# EAGLE board 1794743564906_Budík-Venkovni teplota (EAGLE 9.6.2)
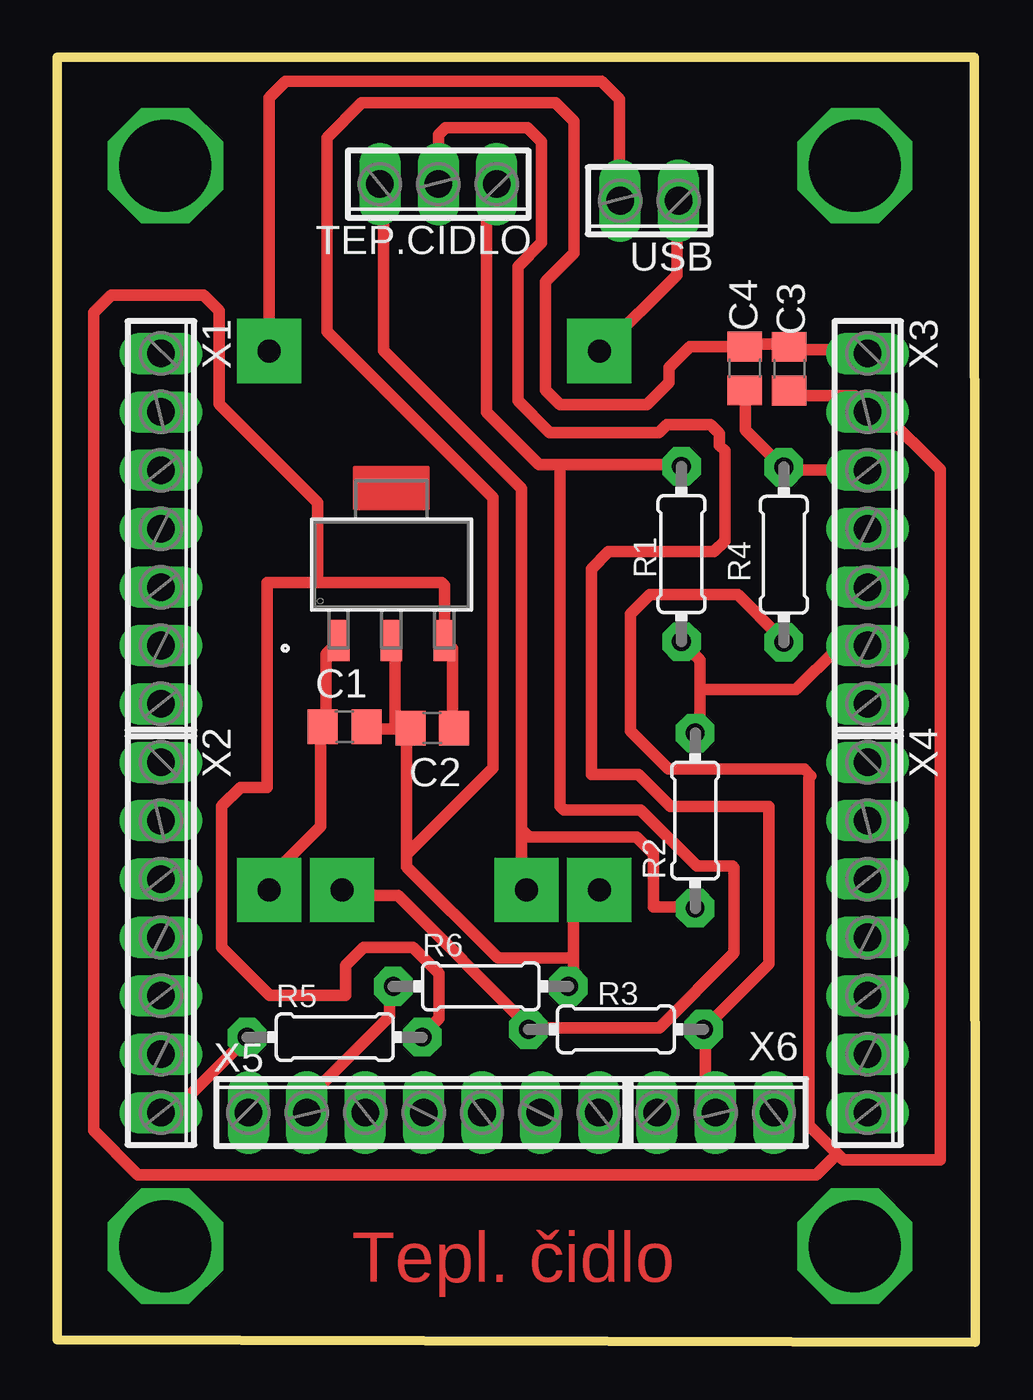
[diagram p0: board, top side]
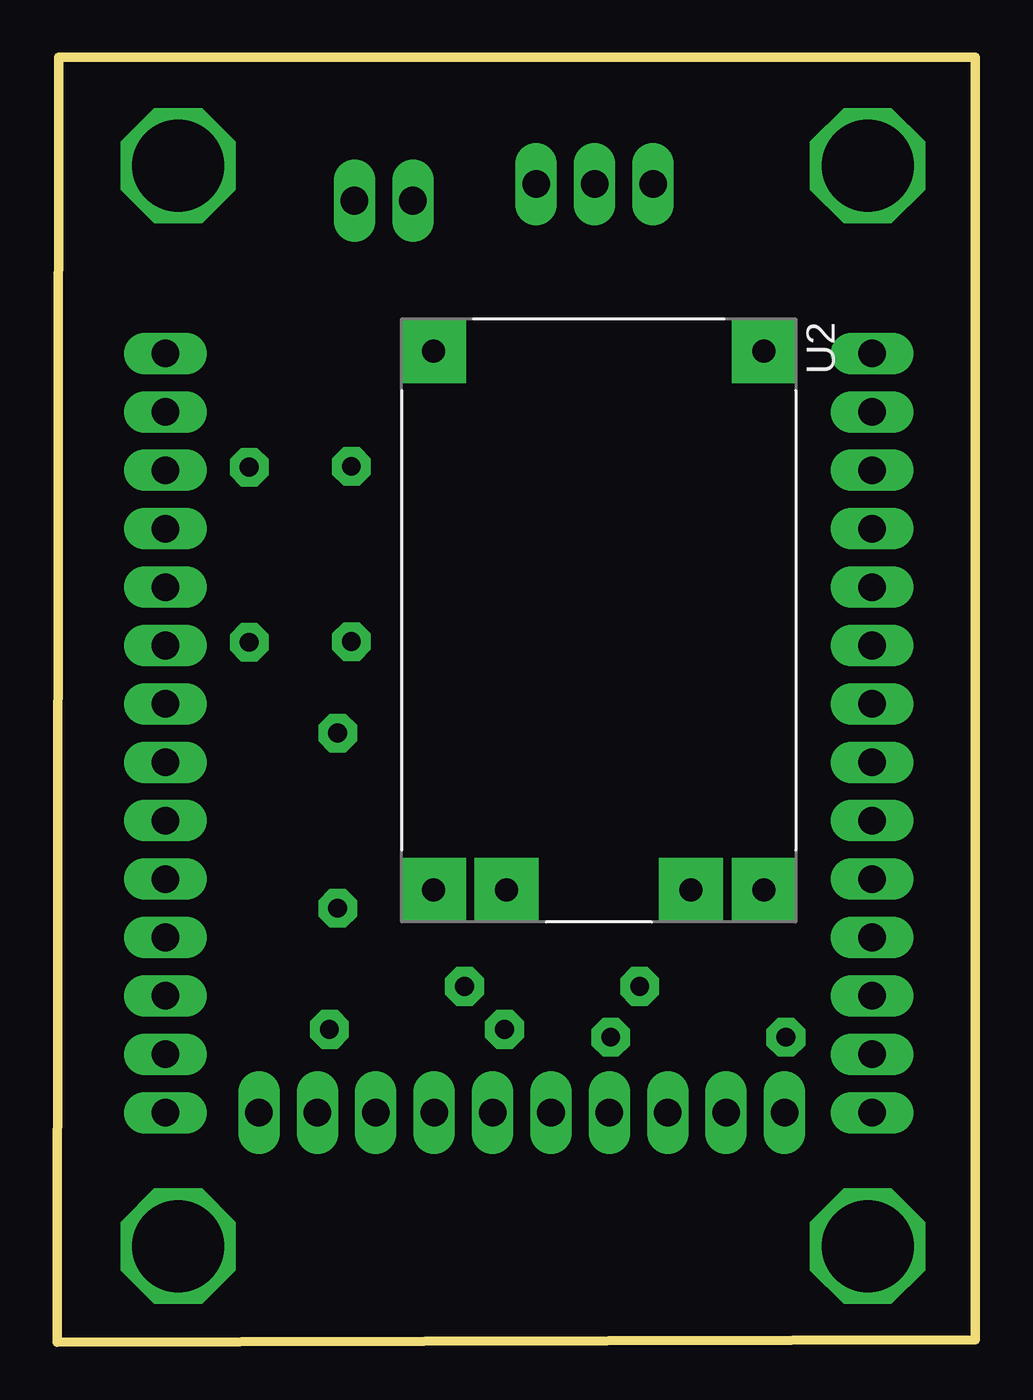
[diagram p1: board, bottom side, seen from below]

Size 39.94 x 55.88 mm. Coordinates in mm from the lower left corner, seen from the top.
Outline: 0,0.09 39.94,0 39.89,55.88 0,55.88 0,0.09
Copper layers (1*16): Top 0.035mm / dielectric 1.5mm / Bottom 0.035mm
Design rules "default": minimum track width 6mil, minimum drill 0.35mm, track to track 6mil, track to pad 6mil, pad to pad 6mil, via to via 6mil, smd to smd 6mil, copper to edge 40mil, drill to drill 6mil, minimum pad ring 10mil, minimum via ring 8mil, stop-mask expansion 4mil, vias tented up to drill 0mil, thermal gap 10mil
Net classes: 0 default: width 0.5 mm, drill 0.3 mm, clearance 0.3 mm

## Footprints (pad centres in the part's own frame; a part is rotated, then mirrored left to right if it is on the bottom)
C0805 = smd 1.3 x 1.5: 1 -0.95,0; 2 0.95,0
0204/7 = drill 0.813 pad 1.676 octagon: 1 -3.81,0; 2 3.81,0
3POL254 = drill 1.2 long: 1 -2.54,0; 2 0,0; 3 2.54,0
SOT-223_3MC_MCH-M = smd 0.94 x 1.778: 1 -2.3,-3.32; 2 0,-3.32; 3 2.3,-3.32
MODULE_TP4056_MICRO-USB_CHARGER_-_1A = drill 1 pad 2.79 square: BAT_N 11.725,-4.01; BAT_P 11.725,4.01; IN_N -11.725,-7.18; IN_P -11.725,7.18; OUT_N 11.725,-7.18; OUT_P 11.725,7.18
2POL254 = drill 1.2 long: 1 -1.27,0; 2 1.27,0
7POL254 = drill 1.2 long: 1 -7.62,0; 2 -5.08,0; 3 -2.54,0; 4 0,0; 5 2.54,0; 6 5.08,0; 7 7.62,0

## Placement (x,y rotation side)
C1  1u  [C0805]  12.49,26.76 0 top
C2  10u  [C0805]  16.31,26.71 180 top
C3  22u  [C0805]  31.84,42.34 90 top
C4  10n  [C0805]  29.89,42.35 90 top
R1  300k  [0204/7]  27.15,34.28 90 top
R2  300k  [0204/7]  27.75,22.68 90 top
R3  4k7  [0204/7]  24.3,13.6 180 top
R4  10k  [0204/7]  31.6,34.25 270 top
R5  10k  [0204/7]  12.06,13.26 0 top
R6  10k  [0204/7]  18.42,15.47 0 top
TEP.CIDLO  [3POL254]  16.57,50.37 180 top
U1  MCP1825S-3302E/DBSOT-223_3MC_MCH-M  [SOT-223_3MC_MCH-M]  14.53,33.83 0 top
U2  TP4056_MICRO-USB_CHARGER_-_1A  [MODULE_TP4056_MICRO-USB_CHARGER_-_1A]  16.39,31.39 270 bottom
USB  [2POL254]  25.75,49.65 180 top
X1  [7POL254]  4.5,35.38 270 top
X2  [7POL254]  4.5,17.6 270 top
X3  [7POL254]  35.25,35.38 270 top
X4  [7POL254]  35.25,17.6 270 top
X5  [7POL254]  15.93,9.98 0 top
X6  [3POL254]  28.63,9.98 0 top

## Library data of the parts
C1-C4 = rcl; SPICEPREFIX: C
R1-R6 = rcl-vetši pad; SPICEPREFIX: R
TEP.CIDLO USB X1-X6 = con-phoenix-254; OC_FARNELL: unknown; OC_NEWARK: unknown
U1 = Stabilizator-MCP1825S; COPYRIGHT: Copyright (C) 2026 Ultra Librarian. All rights reserved.; MANUFACTURER_NAME: Microchip; MANUFACTURER_PART_NUMBER: MCP1825S-3302E/DB
U2 = TP4056_MICRO-USB_CHARGER_-_1A; AVAILABILITY: Not in stock; CHECK_PRICES: https://www.snapeda.com/parts/TP4056%20Micro-USB%20Charger%20-%201A/Generic/view-part/?ref=eda; DESCRIPTION: The TP4056ES Li-Ion micro USB charger is an improved version of the TP4056, ideal for 18650 batteries, with a micro USB connection for direct PC charging.; MF: Generic; MP: TP4056 Micro-USB Charger - 1A; PACKAGE: Package; PRICE: None; SNAPEDA_LINK: https://www.snapeda.com/parts/TP4056%20Micro-USB%20Charger%20-%201A/Generic/view-part/?ref=snap

## Nets
N$1: U2.IN_N USB.1
N$2: U2.IN_P USB.2
N$3: R1.2 R3.2 TEP.CIDLO.1 U2.BAT_P
N$4: R2.1 TEP.CIDLO.3 U2.BAT_N
N$5: C1.1 U1.1 U2.OUT_P
N$6: C1.2 C2.2 C3.2 C4.2 R6.2 U1.2 U2.OUT_N X3.1
N$7: C2.1 C3.1 R4.2 R5.2 U1.3 X3.2
N$8: R1.1 R2.2 X3.6
N$9: R3.1 TEP.CIDLO.2 X6.2
N$14: C4.1 R4.1 X3.3
N$15: R5.1 X2.7
N$16: R6.1 X5.2

## Tracks (layer width: path | path; a pad name or v marks a point on that pad's centre or on a via)
N$1
  Top 0.5: USB.1 26.94,49.42 26.94,46.42 23.69,43.17 U2.IN_N
N$2
  Top 0.5: USB.2 24.44,49.67 24.45,49.68 24.45,54.06 23.67,54.84 9.92,54.84 9.21,54.13 U2.IN_P 9.44,43.17
N$3
  Top 0.5: U2.BAT_P 12.44,19.42 14.81,19.42 20.49,13.74 R3.2 20.69,13.67 26.19,13.67 29.44,16.92 29.44,20.63 29.37,20.7 27.82,20.7 25.37,23.15 22.04,23.15 21.86,23.33 21.86,38.17 | 21.86,38.17 20.95,38.17 18.66,40.46 18.66,49.92 TEP.CIDLO.1 | 21.86,38.17 26.94,38.17 R1.2
N$4
  Top 0.5: 27.65,18.96 R2.1 27.7,18.92 25.92,18.92 25.92,21.24 25.19,21.97 20.51,21.97 20.19,22.29 | U2.BAT_N 20.44,19.67 20.44,20.17 20.19,20.42 20.19,22.29 | TEP.CIDLO.3 14.19,50.17 14.19,43.12 20.19,37.12 20.19,22.29
N$5
  Top 0.5: U1.1 12.19,30.42 11.69,29.92 11.69,26.92 C1.1 11.44,26.67 11.44,22.42 9.44,20.42 9.44,19.67 U2.OUT_P
N$6
  Top 0.5: X3.1 35.19,43.17 31.9,43.17 C3.2 31.7,43.42 29.94,43.42 C4.2 27.51,43.3 26.6,42.39 26.6,41.73 25.65,40.78 21.86,40.78 21.23,41.41 21.23,46.13 22.47,47.37 22.47,53.11 21.67,53.91 13.23,53.91 11.72,52.4 11.72,43.96 18.95,36.73 18.95,24.97 15.19,21.21 | 14.69,26.67 13.44,26.67 C1.2 | 14.69,26.67 15.19,26.67 C2.2 15.19,26.42 15.19,21.21 | 14.69,26.67 14.69,30.42 U1.2 | 22.44,16.7 22.44,18.42 23.44,19.42 U2.OUT_N | 22.44,16.7 22.44,15.67 R6.2 | 15.19,21.21 15.19,20.67 19.16,16.7 22.44,16.7
N$7
  Top 0.3: 35.31,40.42 X3.2
  Top 0.5: C2.1 17.19,26.92 17.19,30.17 16.94,30.42 U1.3 16.83,32.9 16.72,33.03 11.37,33.03 | R5.2 15.94,13.42 16.6,14.08 16.6,16.03 15.47,17.16 13.31,17.16 12.53,16.38 12.53,15.07 9.24,15.07 7.15,17.16 7.15,23.32 7.96,24.13 9.13,24.13 9.13,33.03 11.37,33.03 | C3.1 31.86,41.17 34.69,41.17 35.19,40.67 X3.2 35.44,40.42 35.94,40.42 38.41,37.95 38.41,7.92 34.19,7.92 33.92,8.19 | 33.92,8.19 32.69,9.42 32.69,24.54 32.78,24.63 32.49,24.92 26.59,24.92 24.92,26.59 24.92,31.66 25.77,32.51 29.6,32.51 31.44,30.67 R4.2 | 33.92,8.19 33.02,7.28 3.5,7.28 1.58,9.2 1.58,44.78 2.33,45.53 6.37,45.53 7.03,44.87 7.03,40.8 11.31,36.52 11.31,33.09 11.37,33.03
N$8
  Top 0.5: 27.94,28.38 27.94,29.67 27.19,30.42 R1.1 | 27.94,28.38 27.94,26.91 R2.2 | 27.94,28.38 32.13,28.38 33.92,30.17 35.19,30.17 X3.6
N$9
  Top 0.5: X6.2 28.19,10.42 28.19,13.42 R3.1 30.96,16.45 30.96,23.3 26.66,23.3 25.27,24.69 23.23,24.69 23.23,33.63 23.98,34.38 28.57,34.38 29.03,34.84 29.03,38.77 28.8,39 28.8,39.52 28.4,39.92 26.52,39.92 26.17,39.57 21.41,39.57 20.03,40.95 20.03,46.79 21.06,47.82 21.06,52.21 20.44,52.83 16.89,52.83 16.57,52.51 TEP.CIDLO.2
N$10  (via drill 4 pad 0.3)
  other vias: 4.69,51.17
N$11  (via drill 4 pad 0.3)
  other vias: 34.69,51.17
N$12  (via drill 4 pad 0.3)
  other vias: 4.69,4.17
N$13  (via drill 4 pad 0.3)
  other vias: 34.69,4.17
N$14
  Top 0.5: C4.1 29.94,41.17 29.94,39.67 31.44,38.17 R4.1 31.69,37.92 X3.3
N$15
  Top 0.5: R5.1 8.19,13.17 5.19,10.17 4.69,10.17 X2.7
N$16
  Top 0.5: R6.1 14.44,15.42 14.44,14.17 10.94,10.67 10.94,10.17 X5.2

## Text on the board
Top: Tepl. čidlo